# Altium PCB flux_vides.PcbDoc
Units mil, origin at the board's own origin, x right, y up, seen from the top; angles counter-clockwise.
Board outline 1968.5 x 1574.8 mil, 4 copper layers (Top Layer, Internal Plane 1, Internal Plane 2, Bottom Layer); 17 components, 8 nets, 53 pads, 0 vias.
Unrouted connection lines stored in the file: 32.
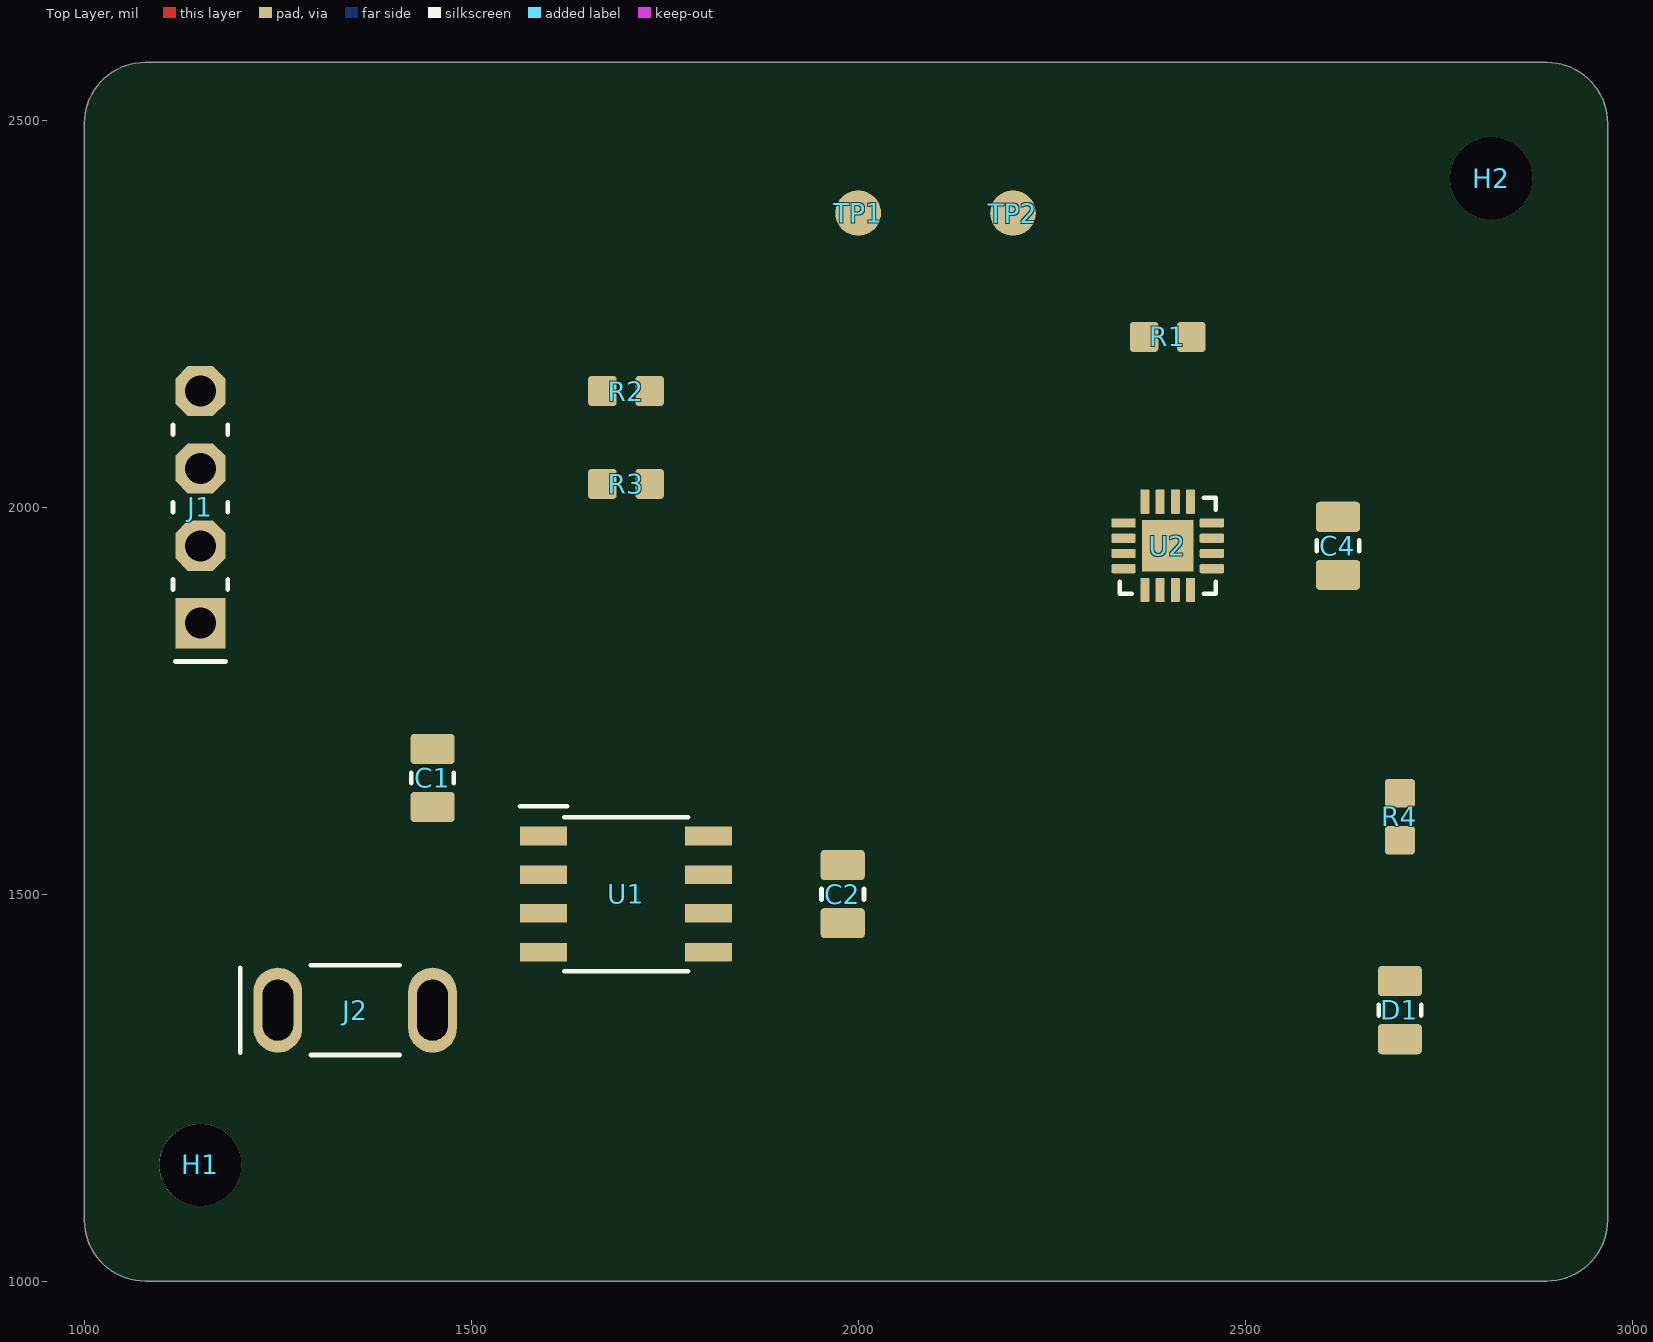
[diagram p0: Top Layer view]
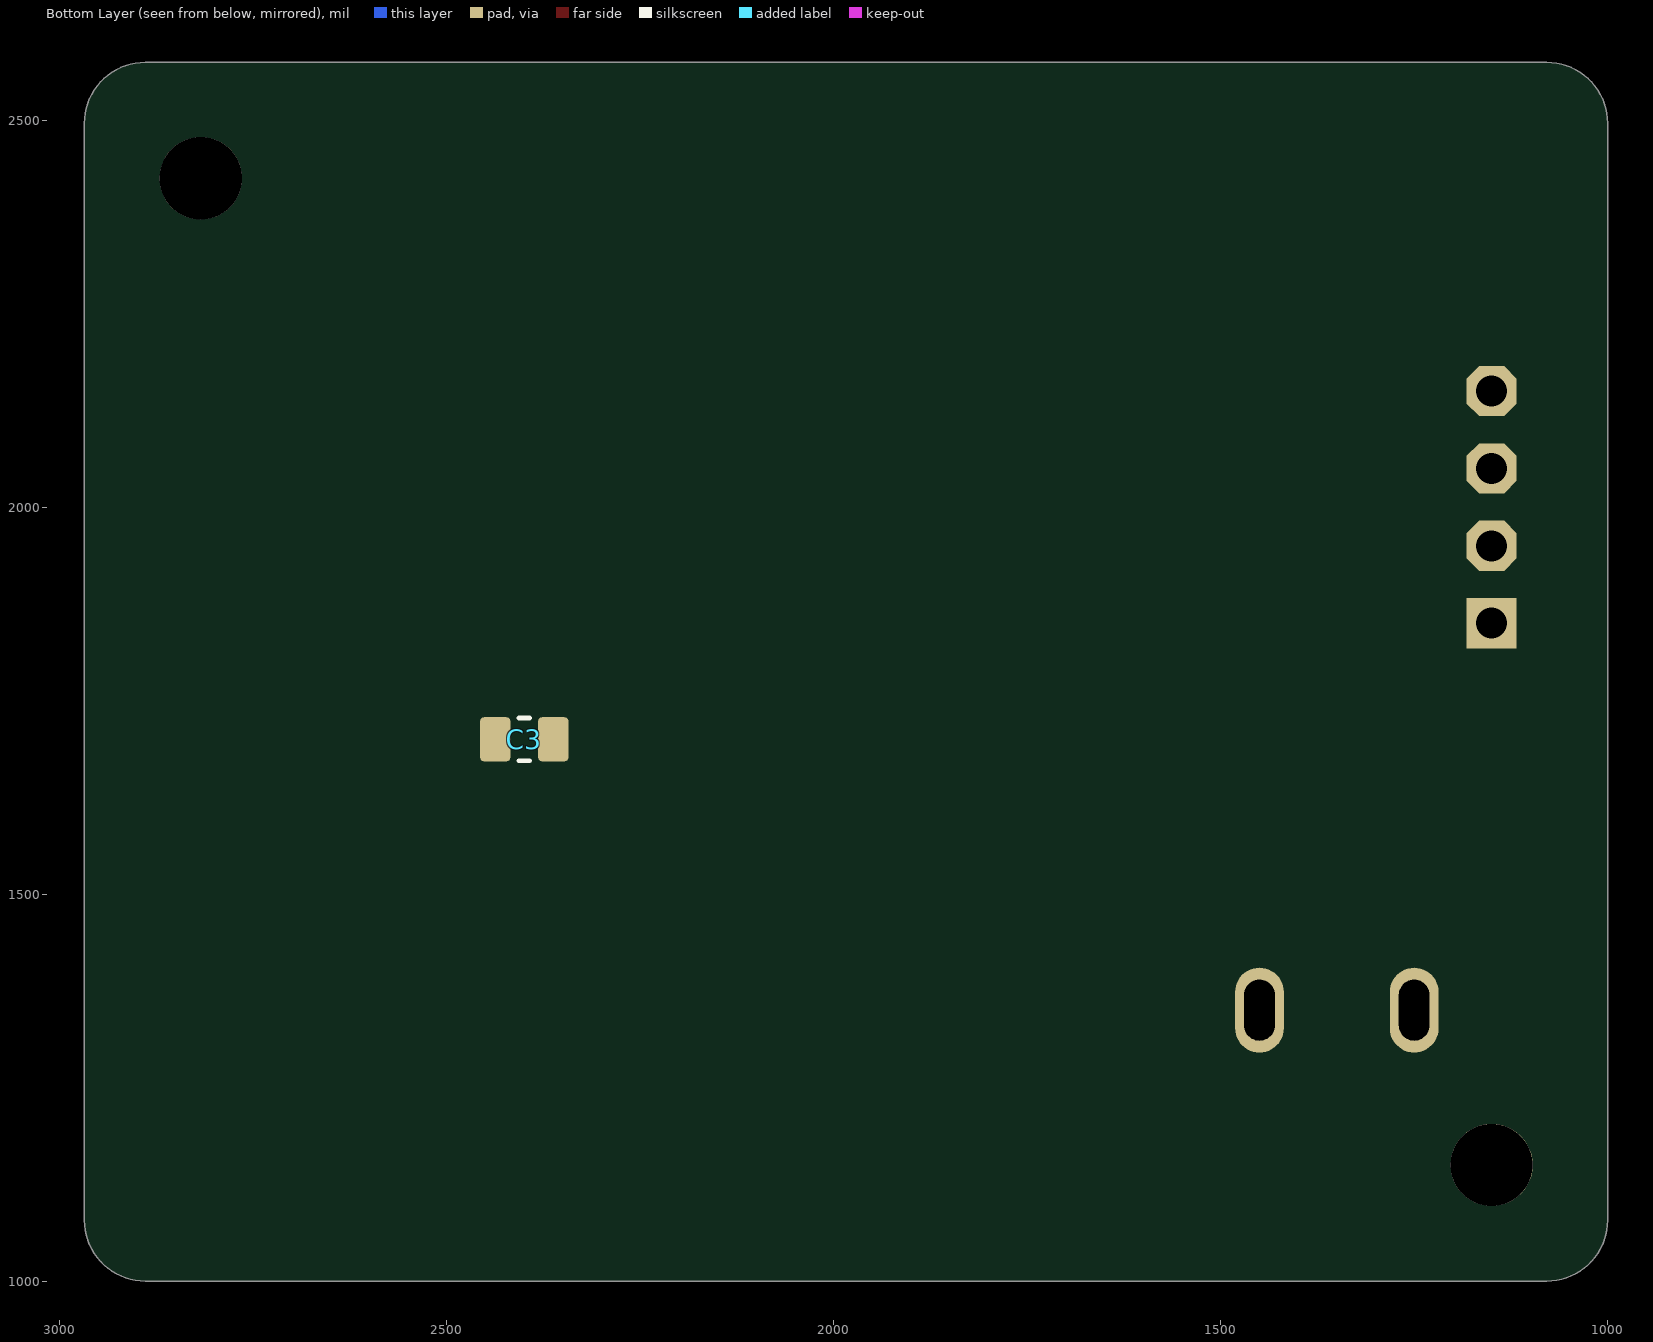
[diagram p1: Bottom Layer view, seen from below]
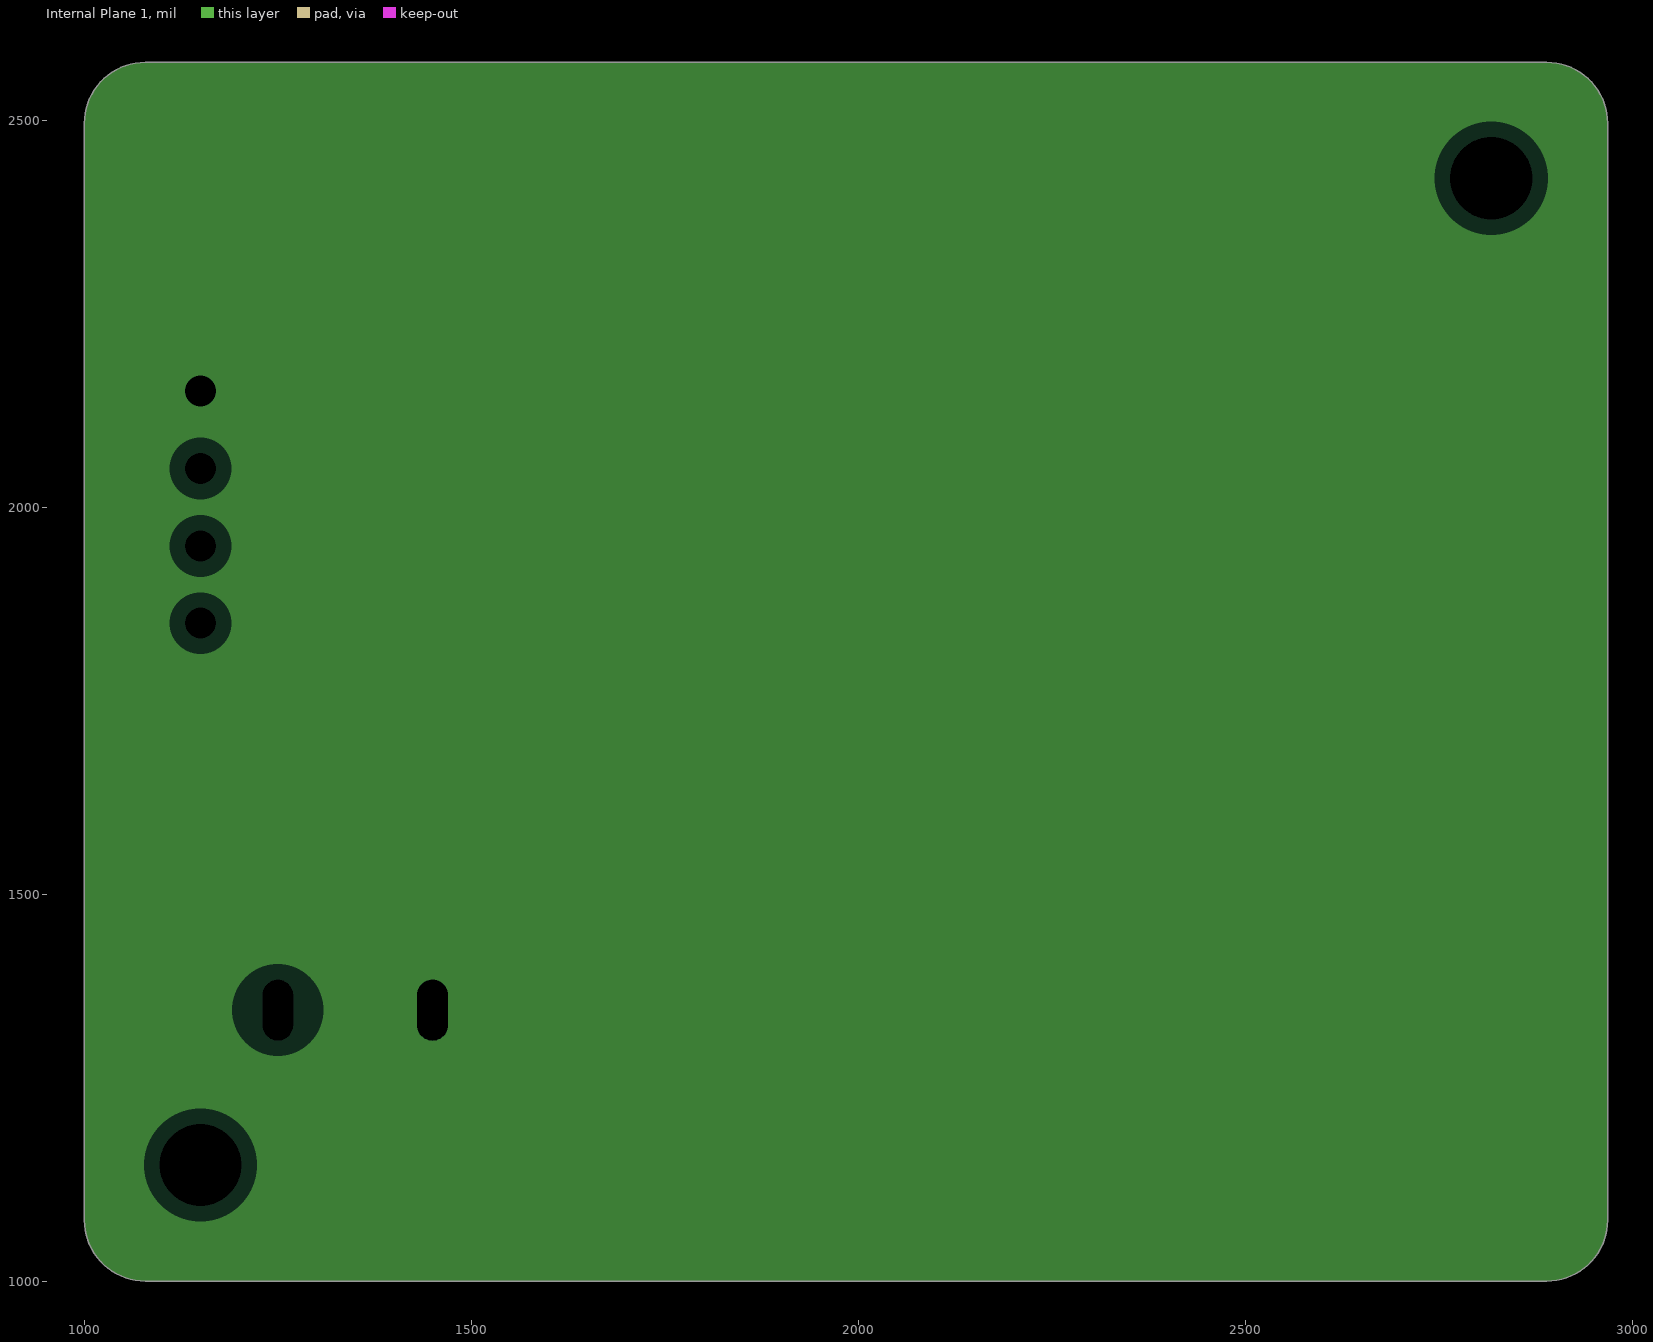
[diagram p2: Internal Plane 1, clearances drawn from the general rule]
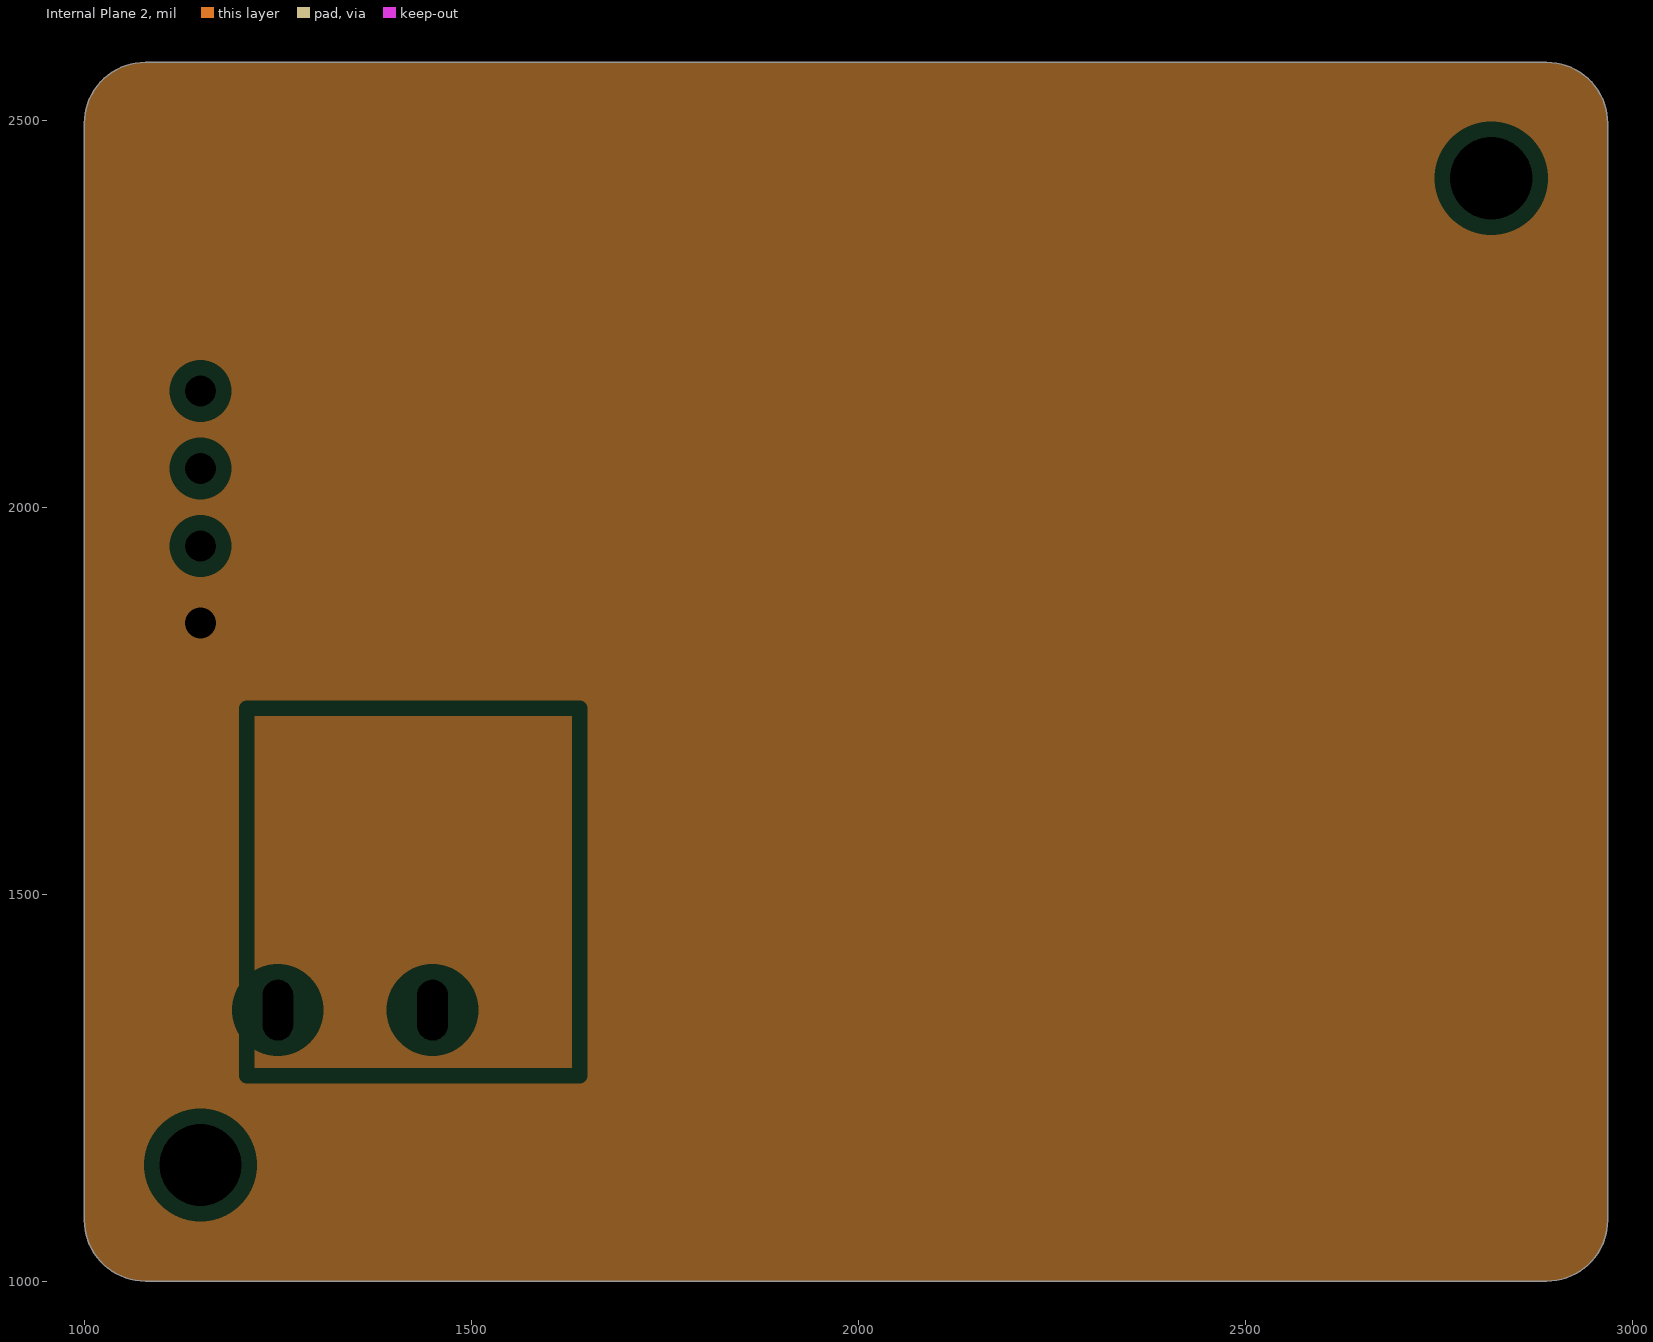
[diagram p3: Internal Plane 2, clearances drawn from the general rule]

## Layer stack, top to bottom
Top Solder: solder mask 0.4, Solder Resist, Dk 3.5
Top Layer: signal copper 1.4
Dielectric 1: dielectric 12.6, FR-4, Dk 4.8
Internal Plane 1: plane copper 1.4, net GND
Dielectric2: dielectric 12.6, FR-4, Dk 4.8
Internal Plane 2: plane copper 1.4, net 3V3
Dielectric3: dielectric 12.6, FR-4, Dk 4.8
Bottom Layer: signal copper 1.4
Bottom Solder: solder mask 0.4, Solder Resist, Dk 3.5

## Board outline
1078.74,1000 2889.76,1000 ccw(c2889.76,1078.74) 2968.5,1078.74 2968.5,2496.06 ccw(c2889.76,2496.06) 2889.76,2574.8 1078.74,2574.8 ccw(c1078.74,2496.06) 1000,2496.06 1000,1078.74 ccw(c1078.74,1078.74)

## Design rules (kind name [scope] priority, off if disabled: settings)
Clearance [All] p1: gap=6 ignorepadtopadclearanceinfootprint=FALSE
Clearance Isolement_QFN16 [InComponent('U2')] p2: gap=6 ignorepadtopadclearanceinfootprint=FALSE
PlaneClearance [All] p1: clearance=20
PlaneConnect [All] p1: planeconnectstyle=Relief reliefexpansion=20 reliefentries=4 reliefconductorwidth=10 reliefairgap=10
PolygonConnect [All] p1: connectstyle=Relief reliefconductorwidth=10 reliefentries=4 polygonreliefangle="90 Angle" airgapwidth=10
RoutingVias [All] p1: holewidth=12 width=24 viastyle="Through Hole" minholewidth=12 minwidth=24 maxholewidth=12 maxwidth=24
SolderMaskExpansion [All] p1: expansion=4 istentingtop=FALSE
ViasUnderSMD Via_pastille_centrale_U2 [InComponent('U2')] p1: allowed=TRUE // Via de masse dans la pastille centrale du QFN16 (même réseau seulement)
Width Largeur_Alimentation [InNetClass('Alimentation')] p1: maxlimit=80 minlimit=10 preferedwidth=20
Width [All] p2: maxlimit=10 minlimit=10 preferedwidth=10
28 further rules are at their usual default settings.

## Classes and differential pairs
net class Alimentation: 3V3 GND VIN

## Components (designator, comment, footprint, x,y, rotation, side; value= is the part's Value field where it differs from the comment)
C1 "" C0805 1450,1650 r90 top
C2 "" C0805 1980,1500 r90 top
C3 "" C0805 2400,1700 r0 bottom
C4 "" C0805 2620,1950 r90 top
D1 "" C0805 2700,1350 r90 top
H1 "" TROU_M2_5 1150,1150 r0 top
H2 "" TROU_M2_5 2818,2425 r0 top
J1 "" HDR1X4 1150,2000 r90 top locked
J2 "" BORNIER2_OBLONG 1350,1350 r0 top
R1 "" R0603 2400,2220 r0 top
R2 "" R0603 1700,2150 r0 top
R3 "" R0603 1700,2030 r0 top
R4 "" R0603 2700,1600 r90 top
TP1 "" TP_ROND 2000,2380 r0 top
TP2 "" TP_ROND 2200,2380 r0 top
U1 "" SOIC8 1700,1500 r0 top
U2 "" QFN16_3X3 2400,1950 r0 top

## Footprints (in the part's own frame and the unit in brackets; to place one, negate y for a bottom-side part, rotate by r counter-clockwise, add the part's x,y. Pads: shape width x height; smd on the part's side, far side on the other; paste and mask are expansions set on the pad)
BORNIER2_OBLONG [mil] "Bornier 2 points, pastilles oblongues et trous oblongs"
  oval 63x110 hole 39.37 slot 78.74 at 90 deg: 1(-100,0) 2(100,0)
  silkscreen extent -148,-58 58,58
C0805 [mil] "Condensateur CMS 0805 (2012)"
  rrect25% 39x57 smd: 1(-37.5,0) 2(37.5,0)
  silkscreen extent -7,-28 7,28
HDR1X4 [mil] "Connecteur 1 x 4 broches traversantes, pas 2,54 mm"
  rect 65x65 hole 40: 1(-150,0)
  oct 65x65 hole 40: 2(-50,0) 3(50,0) 4(150,0)
  silkscreen extent -200,-36 106,36
QFN16_3X3 [mm] "Boitier QFN 16 broches 3 x 3 mm, pas 0,5 mm, pastille centrale"
  rrect25% 0.8x0.3 smd: 1(-1.45,0.75) 2(-1.45,0.25) 3(-1.45,-0.25) 4(-1.45,-0.75) 9(1.45,-0.75) 10(1.45,-0.25) 11(1.45,0.25) 12(1.45,0.75)
  rrect25% 0.3x0.8 smd: 5(-0.75,-1.45) 6(-0.25,-1.45) 7(0.25,-1.45) 8(0.75,-1.45) 13(0.75,1.45) 14(0.25,1.45) 15(-0.25,1.45) 16(-0.75,1.45)
  rect 1.7x1.7 smd: 17(0,0)
  silkscreen extent -1.58,-1.58 1.58,1.58
R0603 [mil] "Resistance CMS 0603 (1608)"
  rrect25% 37x39 smd: 1(-30.5,0) 2(30.5,0)
SOIC8 [mil] "Boitier SOIC 8 broches, pas 1,27 mm"
  rect 61x24 smd: 1(-106.5,75) 2(-106.5,25) 3(-106.5,-25) 4(-106.5,-75) 5(106.5,-75) 6(106.5,-25) 7(106.5,25) 8(106.5,75)
  silkscreen extent -137,-100 80,114
TP_ROND [mil] "Point de test CMS rond 1,5 mm"
  round 59 smd: 1(0,0)
TROU_M2_5 [mm] "Trou de fixation M2,5 non metallise avec zone interdite"
  round 2.7 hole 2.7 unplated: 1(0,0)

## Part data
C1 C2 C3 C4 D1: library part C0805
H1 H2: library part TROU_M2_5
J1: library part HDR1X4
J2: library part BORNIER2_OBLONG
R1 R2 R3 R4: library part R0603
TP1 TP2: library part TP_ROND
U1: library part SOIC8
U2: library part QFN16_3X3

## Nets (pads, with @x,y where several pads share a name; then routed paths per layer and width w, separated by ;. In a path a pad name is that pad's centre, name@x,y a point inside that pad or via, vN(x,y) a via of type N, cw(c..) or ccw(c..) an arc to the next point about the centre after c; other vN are vias at no path point)
3V3: C2.1 C3.1 C4.1 J1.1 R1.1 R2.1 R3.1 TP1.1 U1.7 U1.8 U2.5 U2.13 U2.16
GND: C1.2 C2.2 C3.2 C4.2 D1.2 J1.4 J2.2 TP2.1 U1.2 U2.6 U2.12 U2.17
LED_A: D1.1 R4.2
LED_CMD: R4.1 U2.9
RST: R3.2 U1.3 U2.4
SCL: J1.3 R2.2 U2.2
SDA: J1.2 R1.2 U2.1
VIN: C1.1 J2.1 U1.1
pads on no net: H1.1 H2.1 U1.4 U1.5 U1.6 U2.3 U2.7 U2.8 U2.10 U2.11 U2.14 U2.15

## Other copper
Internal Plane 2 (plane layer: these items are gaps in the copper):
  lines w20: 1210,1265 1210,1740 1640,1740 1640,1265 1210,1265